# Altium PCB Light_SPT_Device_v1.0.PcbDoc (part 3 of 4)
Units mil, origin at the board's own origin, x right, y up, seen from the top; angles counter-clockwise.
Board outline 3454 x 2460 mil, 2 copper layers (Top Layer, Bottom Layer), stack 57 mil thick; 156 components, 115 nets, 552 pads, 270 vias.
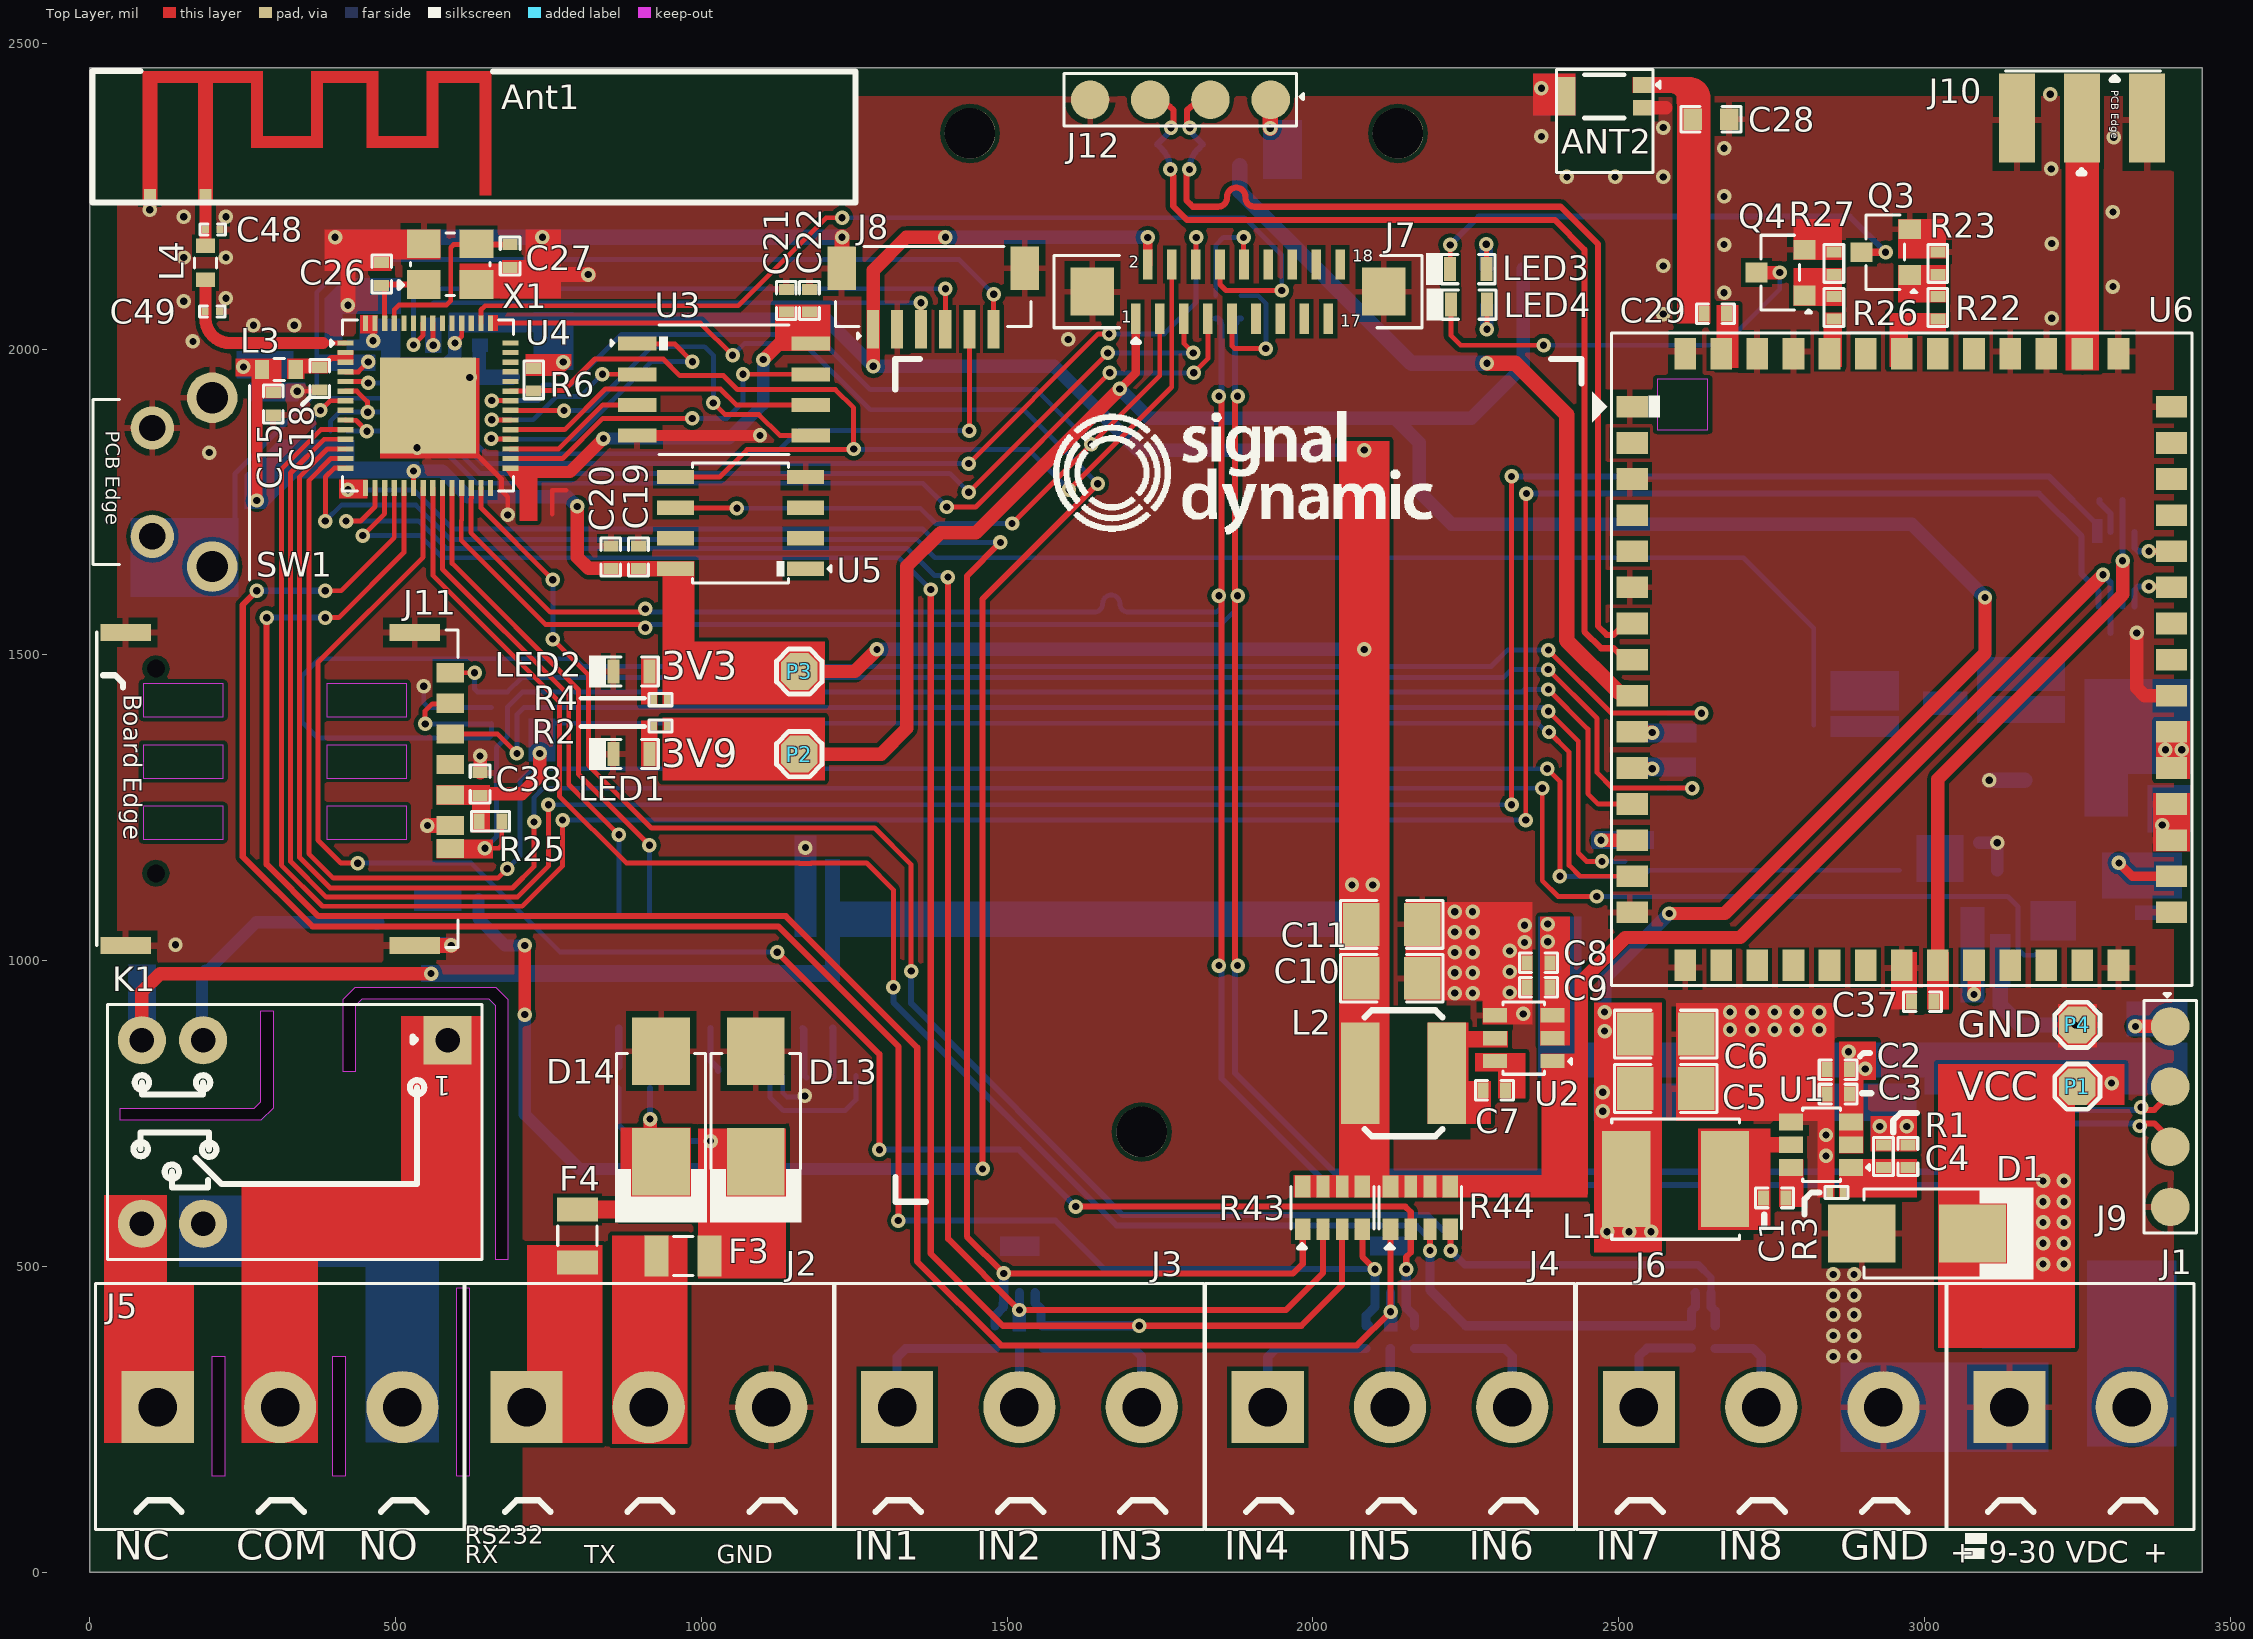
[diagram p0: Top Layer view]

## Via types
v1: diameter 23.62, hole 11.81, Top Layer to Bottom Layer, tented both sides, 204 vias
v2: diameter 23.62, hole 11.81, Top Layer to Bottom Layer, 66 vias

## Nets (pads, with @x,y where several pads share a name; then routed paths per layer and width w, separated by ;. In a path a pad name is that pad's centre, name@x,y a point inside that pad or via, vN(x,y) a via of type N, cw(c..) or ccw(c..) an arc to the next point about the centre after c; other vN are vias at no path point) (continued)
3V3: (continued)
  Bottom Layer w22: 402.5,1821.5 422,1802 434.39,1802 ; 497,1975.69 583.73,1975.69 596.62,1988.58 596.62,2009.69 v1(596.93,2010) 596.93,2037 ; C25.2@504,1801.5 504.44,1801.06 529.24,1801.06 v1@529.55,1800.75 ; v1(529.24,1800.75) v1@529.55,1800.75 ; 609.82,2043.2 C12.2@637.71,2043.2 ; D3.1@690.71,2044.48 D3.1@695.46,2049.23 ; v1@771,1984 v1@771,1989 ; 787,2049 1204,2049 v1(1281,1972) 1577,1972 1714,1835 v1(2083.9,1835) ; v1(797,1743) 796.56,1743 780.75,1758.81 618.19,1758.81 576.25,1800.75 v1@529.55,1800.75 ; v1(1287,1509) v1(2083.9,1509) ; v1(1399,2183) v1@1729.82,2183
  other v1: 251,1971
  other v2: 2063.9,1124.01 2097.9,1124.01
3V9: C4.2 C5.2 C6.2 C30.2 J7.1 L1.2 P2.1 Q2.2 R1.2 R2.2 R15.2 R21.1 R24.1 | length 4251.9
  Top Layer w12: J7.1@1708.26,2047.97 J7.1@1710.13,2049.84
  Top Layer w14: v1(1684,1935) 1710.13,1961.13 J7.1@1710.13,2049.84
  Top Layer w22: P2.1@1160,1338 1294,1338 1336,1380 1336,1645 1391,1700 1449,1700 v1(1684,1935) ; v1(2582.81,1077.25) 2673.25,1077.25 3099,1503 v1(3099,1594)
  Bottom Layer w22: v1(1684,1935) 1732,1887 2259,1887 2344,1972 R24.1@2344,2071 R21.1@2344,2132 ; 2136,1885 2174,1847 2174,1767 2227,1714 2979,1714 v1(3099,1594) ; v2(2477,885) 2477,971.44 v1(2582.81,1077.25) ; 3099,1481 v1(3099,1594) ; v1@3099,1597 v1(3099,1594) ; 3107,1481 3146,1481 3158,1469
  other v2: 2481,556.81 2517,556.81 2553,556.81 2927,729 2971,729 2474,754 2474,785 2477,916
BTN1: J7.5 R11.1 U4.6 | length 1704.7
  Top Layer w8: U4.6@418.02,1931.46 436.54,1931.46 453.79,1914.21 453.79,1897.47 v1(454.26,1897) ; v1(1437,1766) v1@1664.63,1993.63 ; J7.5@1788.87,2049.84 1788.87,2009.5 v1(1804.39,1993.98)
  Bottom Layer w8: R11.1@393.25,1866 393.25,1882.25 408,1897 537.31,1897 637.31,1797 1406,1797 v1(1437,1766) ; v1(1664.63,1993.98) v1(1804.39,1993.98)
BTN2: J7.6 R12.1 U4.7 | length 1829.5
  Top Layer w8: v1(377,1900) 392.72,1915.72 U4.7@418.02,1915.72 ; v1(1437,1813) 1648.98,2024.98 v1(1666.63,2025) ; J7.6@1808.56,2138.43 1808.78,2138.65 1808.78,2181.78 v1@1809,2182
  Bottom Layer w8: R12.1@366,1866 366,1889 v1(377,1900) 396.81,1919.81 535.72,1919.81 642.53,1813 v1(1437,1813) ; v1(1666.63,2025) 1757,2025 1809,2077 v1(1809,2182.82)
BTN3: J7.7 R13.1 U4.9 | length 1667.9
  Top Layer w8: U4.9@418.02,1884.22 418.35,1883.89 435.11,1883.89 v1(453,1866) ; v1(1401,1742) 1448.52,1742 v1(1667.85,1961.33) ; v1(1805,1961.33) 1828.24,1984.58 J7.7@1828.24,2049.84
  Bottom Layer w8: R13.1@420,1866 v1(453,1866) 547,1866 632.19,1780.81 1362.19,1780.81 v1(1401,1742) ; v1(1667.85,1961.33) v1(1805,1961.33)